# Altium PCB CM5IO_V2.PcbDoc (part 1 of 4)
Units mm, origin at the board's own origin, x right, y up, seen from the top; angles counter-clockwise.
Board outline 160 x 90 mm, 4 copper layers (F.Cu, In1.Cu, In2.Cu, B.Cu); 77 components, 161 nets, 674 pads, 703 vias.
Unrouted connection lines stored in the file: 47.
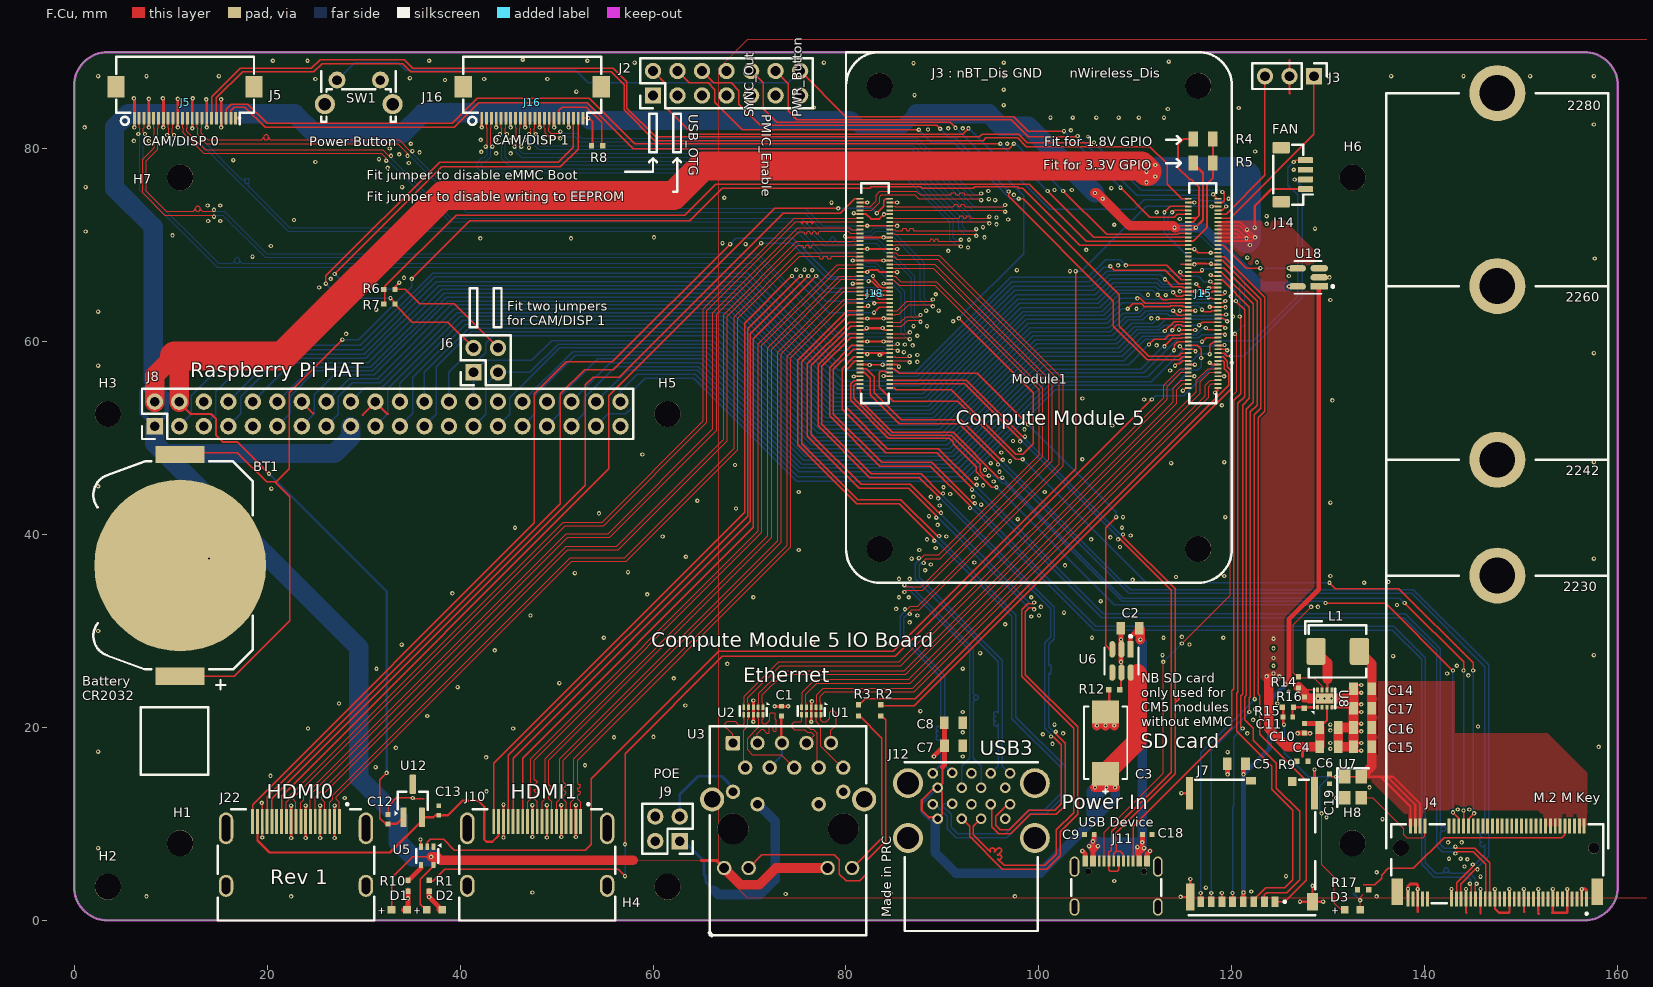
[diagram p0: F.Cu view]
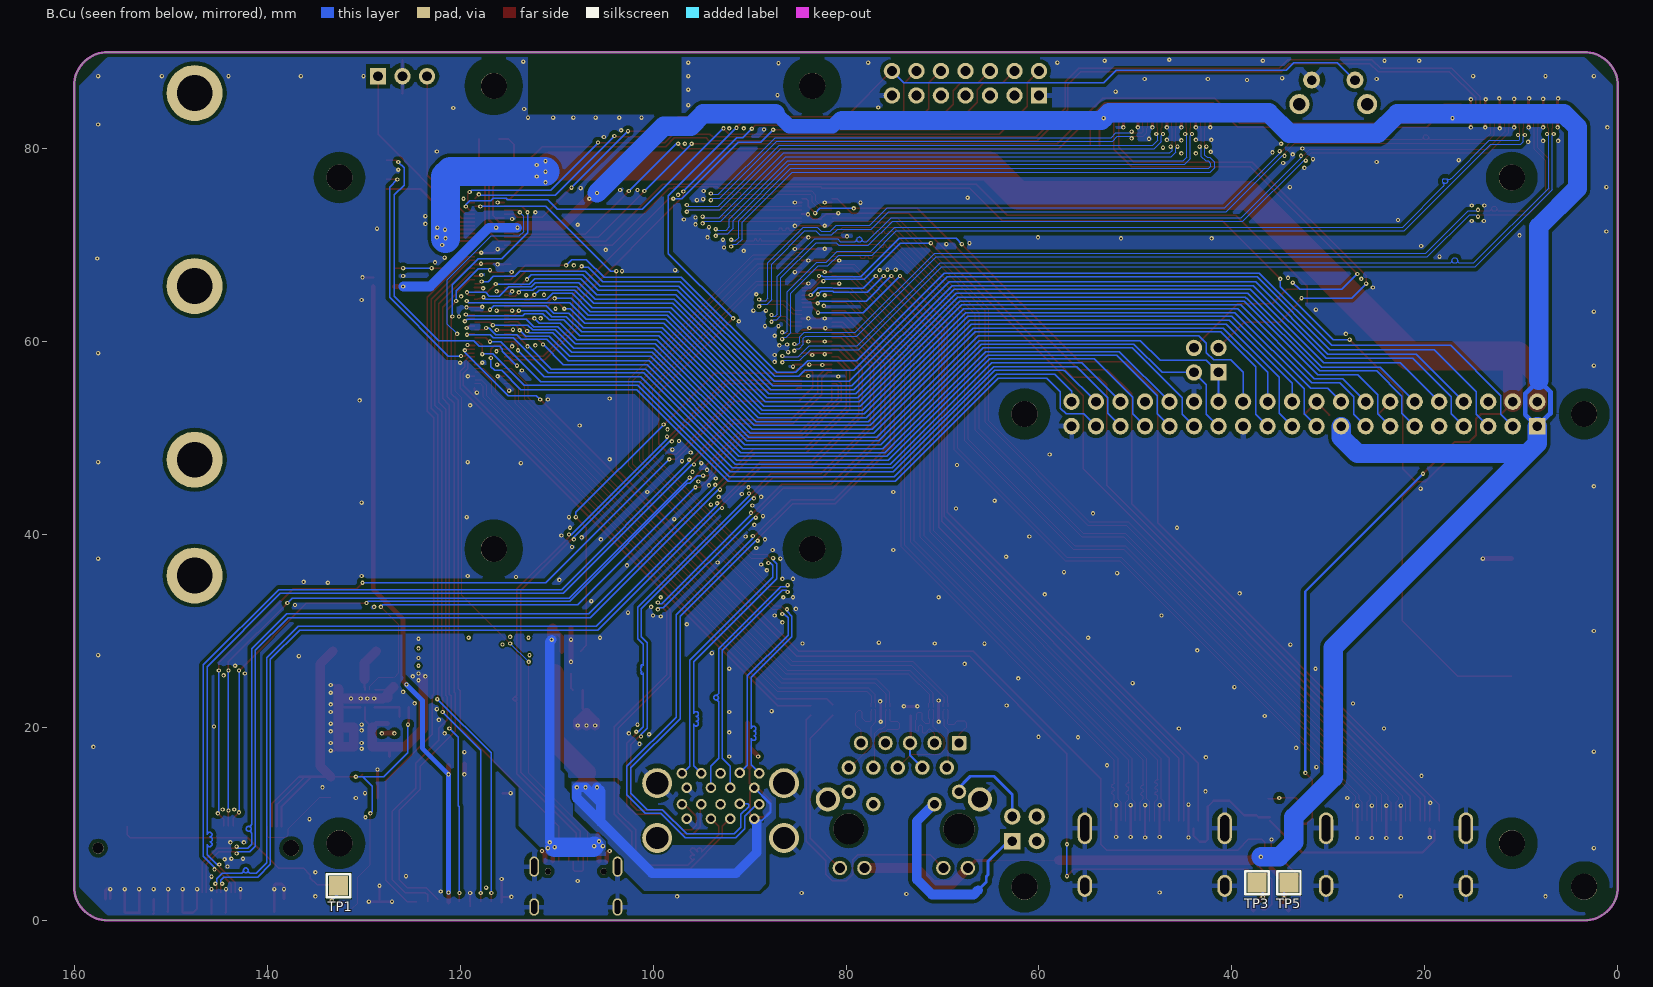
[diagram p1: B.Cu view, seen from below]
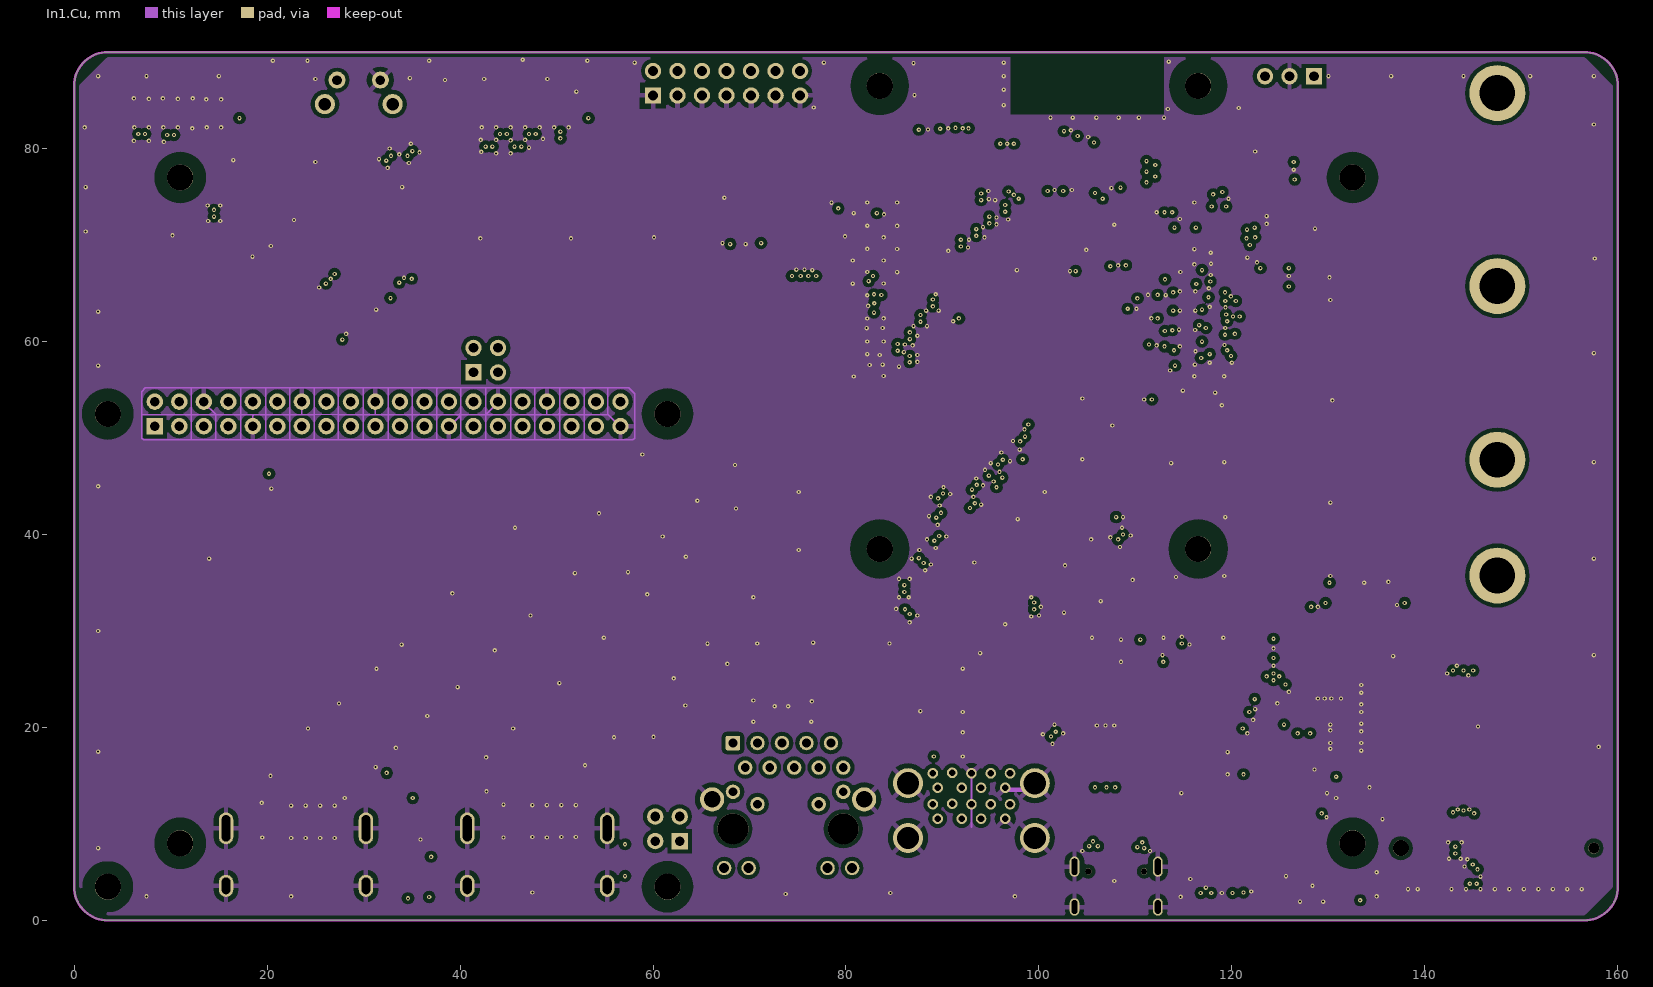
[diagram p2: In1.Cu]
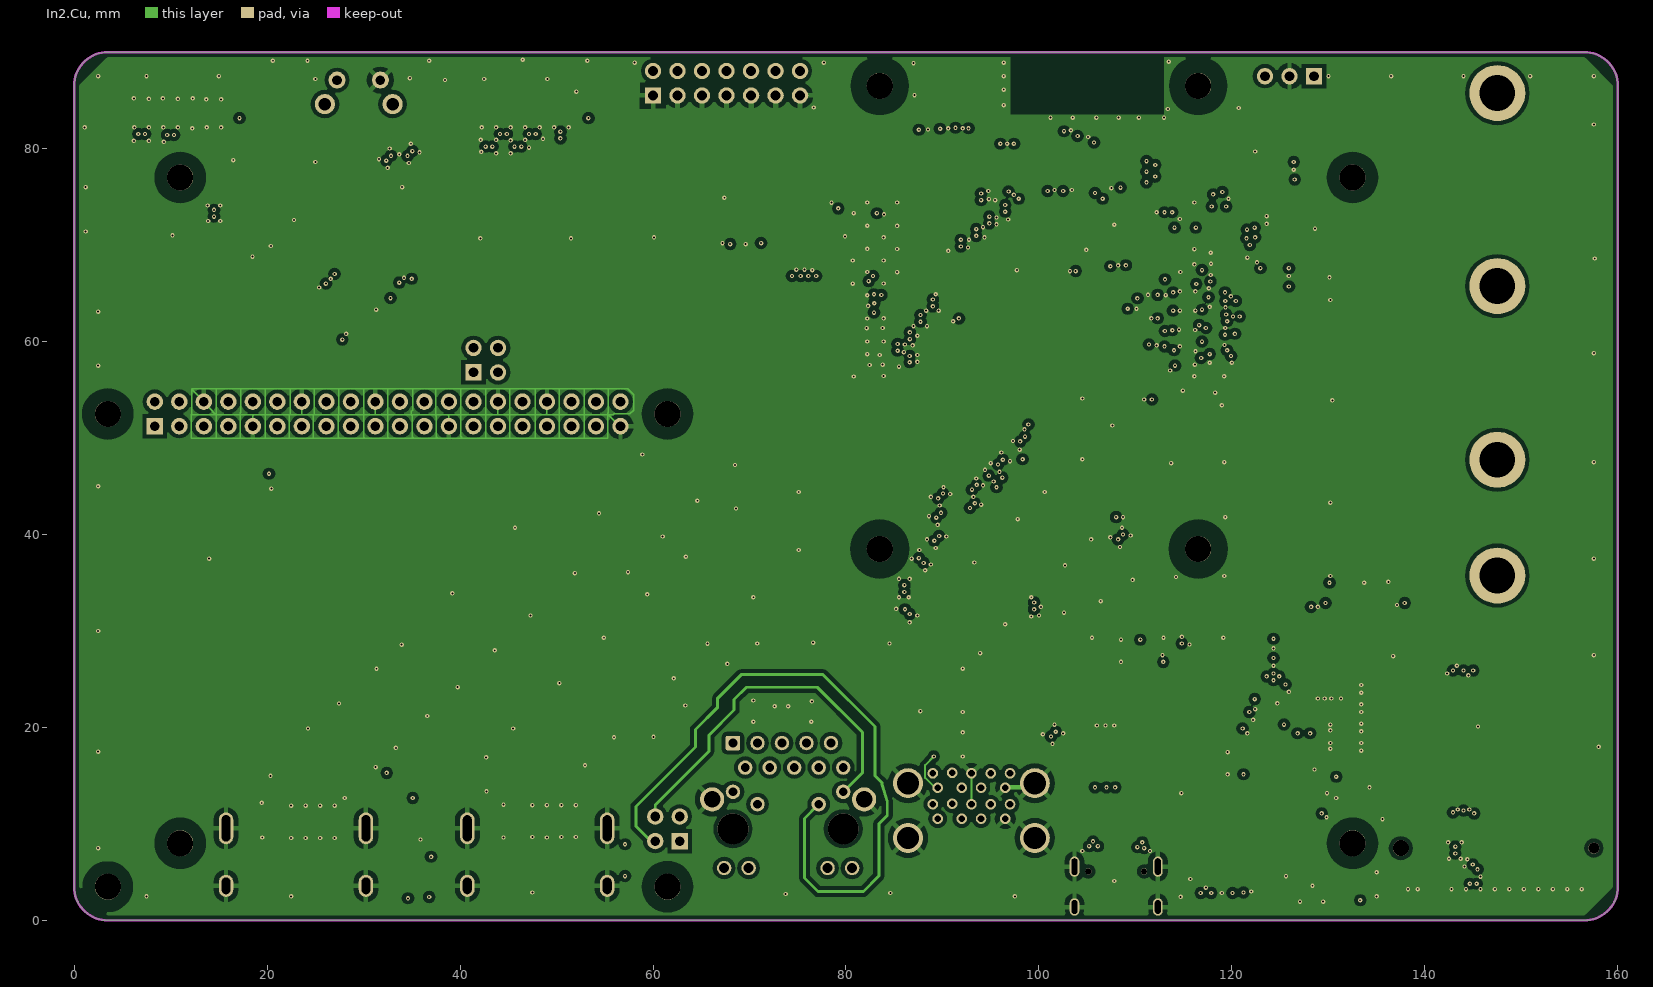
[diagram p3: In2.Cu]

## Layer stack, top to bottom
F.Mask: solder mask 0.0102, Solder Resist, Dk 3.5
F.Cu: signal copper 0.0356
Dielectric 1: dielectric 0.32, FR-4, Dk 4.8
In1.Cu: signal copper 0.0356
Dielectric2: dielectric 0.32, FR-4, Dk 4.8
In2.Cu: signal copper 0.0356
Dielectric3: dielectric 0.32, FR-4, Dk 4.8
B.Cu: signal copper 0.0356
B.Mask: solder mask 0.0102, Solder Resist, Dk 3.5

## Board outline
156.5,0 ccw(c156.5,3.5) 160,3.5 160,86.5 ccw(c156.5,86.5) 156.5,90 3.5,90 ccw(c3.5,86.5) 0,86.5 0,3.5 ccw(c3.5,3.5) 3.5,0 156.5,0

## Design rules (kind name [scope] priority, off if disabled: settings)
Clearance "Clearence 1.7_PadClass" [InPadClass('Pad Class Clearance 1.7')] p1: gap=1.7 ignorepadtopadclearanceinfootprint=FALSE
Clearance "Clearence 1.3_PadClass" [InPadClass('Pad Class Clearance 1.3')] p2: gap=1.3 ignorepadtopadclearanceinfootprint=FALSE
Clearance "Clearence 0.4_Polygon" [InNamedPolygon('In1.Cu-GND') OR InNamedPolygon('In2.Cu-GND')] p3: gap=0.4 ignorepadtopadclearanceinfootprint=FALSE
Clearance "Clearence 0.39_Polygon" [InNamedPolygon('F.Cu-GND') OR InNamedPolygon('B.Cu-GND')] p4: gap=0.39 ignorepadtopadclearanceinfootprint=FALSE
Clearance "Clearence 0.2_Polygon" [InNamedPolygon('F.Cu-/PCIe-M2/M2_3v3') OR InNamedPolygon('F.Cu-/+5v') OR InNamedPolygon('F.Cu-/PCIe-M2/M2_3v3-1') OR InNamedPolygon('B.Cu-/+5v') OR InNamedPolygon('B.Cu-/CM5_HighSpeed/VBUS')] p5: gap=0.2 ignorepadtopadclearanceinfootprint=FALSE
MinimumSolderMaskSliver [All] p1: minsoldermaskwidth=0
PolygonConnect Polygon_B.Cu-/CM5_HighSpeed/VBUS_ConnectDirect [IsNamedPolygon('B.Cu-/CM5_HighSpeed/VBUS') vs IsVia] p1: connectstyle=Direct reliefconductorwidth=0.254 reliefentries=4 polygonreliefangle="90 Angle" airgapwidth=0.254
PolygonConnect Polygon_B.Cu-/CM5_HighSpeed/VBUS_ConnectRelief45 [IsNamedPolygon('B.Cu-/CM5_HighSpeed/VBUS') vs (IsThruPin or IsSMTPin) and (PadShape_AllLayers = 'Round')] p2: connectstyle=Relief reliefconductorwidth=0.5 reliefentries=4 polygonreliefangle="45 Angle" airgapwidth=0.5
PolygonConnect Polygon_B.Cu-/CM5_HighSpeed/VBUS_ConnectRelief90 [IsNamedPolygon('B.Cu-/CM5_HighSpeed/VBUS') vs (IsThruPin or IsSMTPin) and (PadShape_AllLayers <> 'Round')] p3: connectstyle=Relief reliefconductorwidth=0.5 reliefentries=4 polygonreliefangle="90 Angle" airgapwidth=0.5
PolygonConnect Polygon_B.Cu-/+5v_ConnectDirect [IsNamedPolygon('B.Cu-/+5v') vs IsVia] p4: connectstyle=Direct reliefconductorwidth=0.254 reliefentries=4 polygonreliefangle="90 Angle" airgapwidth=0.254
PolygonConnect Polygon_B.Cu-/+5v_ConnectRelief45 [IsNamedPolygon('B.Cu-/+5v') vs (IsThruPin or IsSMTPin) and (PadShape_AllLayers = 'Round')] p5: connectstyle=Relief reliefconductorwidth=0.5 reliefentries=4 polygonreliefangle="45 Angle" airgapwidth=0.5
PolygonConnect Polygon_B.Cu-/+5v_ConnectRelief90 [IsNamedPolygon('B.Cu-/+5v') vs (IsThruPin or IsSMTPin) and (PadShape_AllLayers <> 'Round')] p6: connectstyle=Relief reliefconductorwidth=0.5 reliefentries=4 polygonreliefangle="90 Angle" airgapwidth=0.5
PolygonConnect Polygon_B.Cu-GND_ConnectDirect [IsNamedPolygon('B.Cu-GND') vs IsVia] p7: connectstyle=Direct reliefconductorwidth=0.254 reliefentries=4 polygonreliefangle="90 Angle" airgapwidth=0.254
PolygonConnect Polygon_B.Cu-GND_ConnectRelief45 [IsNamedPolygon('B.Cu-GND') vs (IsThruPin or IsSMTPin) and (PadShape_AllLayers = 'Round')] p8: connectstyle=Relief reliefconductorwidth=0.508 reliefentries=4 polygonreliefangle="45 Angle" airgapwidth=0.508
PolygonConnect Polygon_B.Cu-GND_ConnectRelief90 [IsNamedPolygon('B.Cu-GND') vs (IsThruPin or IsSMTPin) and (PadShape_AllLayers <> 'Round')] p9: connectstyle=Relief reliefconductorwidth=0.508 reliefentries=4 polygonreliefangle="90 Angle" airgapwidth=0.508
PolygonConnect Polygon_In2.Cu-GND_ConnectDirect [IsNamedPolygon('In2.Cu-GND') vs IsVia] p10: connectstyle=Direct reliefconductorwidth=0.254 reliefentries=4 polygonreliefangle="90 Angle" airgapwidth=0.254
PolygonConnect Polygon_In2.Cu-GND_ConnectRelief45 [IsNamedPolygon('In2.Cu-GND') vs (IsThruPin or IsSMTPin) and (PadShape_AllLayers = 'Round')] p11: connectstyle=Relief reliefconductorwidth=0.508 reliefentries=4 polygonreliefangle="45 Angle" airgapwidth=0.508
PolygonConnect Polygon_In2.Cu-GND_ConnectRelief90 [IsNamedPolygon('In2.Cu-GND') vs (IsThruPin or IsSMTPin) and (PadShape_AllLayers <> 'Round')] p12: connectstyle=Relief reliefconductorwidth=0.508 reliefentries=4 polygonreliefangle="90 Angle" airgapwidth=0.508
PolygonConnect Polygon_In1.Cu-GND_ConnectDirect [IsNamedPolygon('In1.Cu-GND') vs IsVia] p13: connectstyle=Direct reliefconductorwidth=0.254 reliefentries=4 polygonreliefangle="90 Angle" airgapwidth=0.254
PolygonConnect Polygon_In1.Cu-GND_ConnectRelief45 [IsNamedPolygon('In1.Cu-GND') vs (IsThruPin or IsSMTPin) and (PadShape_AllLayers = 'Round')] p14: connectstyle=Relief reliefconductorwidth=0.508 reliefentries=4 polygonreliefangle="45 Angle" airgapwidth=0.508
PolygonConnect Polygon_In1.Cu-GND_ConnectRelief90 [IsNamedPolygon('In1.Cu-GND') vs (IsThruPin or IsSMTPin) and (PadShape_AllLayers <> 'Round')] p15: connectstyle=Relief reliefconductorwidth=0.508 reliefentries=4 polygonreliefangle="90 Angle" airgapwidth=0.508
PolygonConnect Polygon_F.Cu-GND_ConnectDirect [IsNamedPolygon('F.Cu-GND') vs IsVia] p16: connectstyle=Direct reliefconductorwidth=0.254 reliefentries=4 polygonreliefangle="90 Angle" airgapwidth=0.254
PolygonConnect Polygon_F.Cu-GND_ConnectRelief45 [IsNamedPolygon('F.Cu-GND') vs (IsThruPin or IsSMTPin) and (PadShape_AllLayers = 'Round')] p17: connectstyle=Relief reliefconductorwidth=0.508 reliefentries=4 polygonreliefangle="45 Angle" airgapwidth=0.508
PolygonConnect Polygon_F.Cu-GND_ConnectRelief90 [IsNamedPolygon('F.Cu-GND') vs (IsThruPin or IsSMTPin) and (PadShape_AllLayers <> 'Round')] p18: connectstyle=Relief reliefconductorwidth=0.508 reliefentries=4 polygonreliefangle="90 Angle" airgapwidth=0.508
PolygonConnect Polygon_F.Cu-/PCIe-M2/M2_3v3-1_ConnectDirect [IsNamedPolygon('F.Cu-/PCIe-M2/M2_3v3-1') vs IsVia] p19: connectstyle=Direct reliefconductorwidth=0.254 reliefentries=4 polygonreliefangle="90 Angle" airgapwidth=0.254
PolygonConnect Polygon_F.Cu-/PCIe-M2/M2_3v3-1_ConnectRelief45 [IsNamedPolygon('F.Cu-/PCIe-M2/M2_3v3-1') vs (IsThruPin or IsSMTPin) and (PadShape_AllLayers = 'Round')] p20: connectstyle=Relief reliefconductorwidth=0.5 reliefentries=4 polygonreliefangle="45 Angle" airgapwidth=0.5
PolygonConnect Polygon_F.Cu-/PCIe-M2/M2_3v3-1_ConnectRelief90 [IsNamedPolygon('F.Cu-/PCIe-M2/M2_3v3-1') vs (IsThruPin or IsSMTPin) and (PadShape_AllLayers <> 'Round')] p21: connectstyle=Relief reliefconductorwidth=0.5 reliefentries=4 polygonreliefangle="90 Angle" airgapwidth=0.5
PolygonConnect Polygon_F.Cu-/+5v_ConnectDirect [IsNamedPolygon('F.Cu-/+5v') vs IsVia] p22: connectstyle=Direct reliefconductorwidth=0.254 reliefentries=4 polygonreliefangle="90 Angle" airgapwidth=0.254
PolygonConnect Polygon_F.Cu-/+5v_ConnectRelief45 [IsNamedPolygon('F.Cu-/+5v') vs (IsThruPin or IsSMTPin) and (PadShape_AllLayers = 'Round')] p23: connectstyle=Relief reliefconductorwidth=0.5 reliefentries=4 polygonreliefangle="45 Angle" airgapwidth=0.5
PolygonConnect Polygon_F.Cu-/+5v_ConnectRelief90 [IsNamedPolygon('F.Cu-/+5v') vs (IsThruPin or IsSMTPin) and (PadShape_AllLayers <> 'Round')] p24: connectstyle=Relief reliefconductorwidth=0.5 reliefentries=4 polygonreliefangle="90 Angle" airgapwidth=0.5
PolygonConnect Polygon_F.Cu-/PCIe-M2/M2_3v3_ConnectDirect [IsNamedPolygon('F.Cu-/PCIe-M2/M2_3v3') vs IsVia] p25: connectstyle=Direct reliefconductorwidth=0.254 reliefentries=4 polygonreliefangle="90 Angle" airgapwidth=0.254
PolygonConnect Polygon_F.Cu-/PCIe-M2/M2_3v3_ConnectRelief45 [IsNamedPolygon('F.Cu-/PCIe-M2/M2_3v3') vs (IsThruPin or IsSMTPin) and (PadShape_AllLayers = 'Round')] p26: connectstyle=Relief reliefconductorwidth=0.5 reliefentries=4 polygonreliefangle="45 Angle" airgapwidth=0.5
PolygonConnect Polygon_F.Cu-/PCIe-M2/M2_3v3_ConnectRelief90 [IsNamedPolygon('F.Cu-/PCIe-M2/M2_3v3') vs (IsThruPin or IsSMTPin) and (PadShape_AllLayers <> 'Round')] p27: connectstyle=Relief reliefconductorwidth=0.5 reliefentries=4 polygonreliefangle="90 Angle" airgapwidth=0.5
RoutingVias [All] p1: holewidth=0.711 width=1.27 viastyle="Through Hole" minholewidth=0.711 minwidth=1.27 maxholewidth=0.711 maxwidth=1.27
SilkToSilkClearance [All] p1: silktosilkclearance=0
SilkToSolderMaskClearance [IsPad] p1: minsilkscreentomaskgap=0 clearancetoexposedcopper=TRUE
SolderMaskExpansion [All] p1: expansion=0.102 istentingtop=FALSE
SupplyNets "Schematic Supply Nets_7" [InNet('M2_3v3')] p1: voltage=0.000
SupplyNets "Schematic Supply Nets_6" [InNet('HDMI_5v')] p2: voltage=0.000
SupplyNets "Schematic Supply Nets_5" [InNet('VBUS')] p3: voltage=0.000
SupplyNets "Schematic Supply Nets_4" [InNet('SD_PWR')] p4: voltage=0.000
SupplyNets "Schematic Supply Nets_3" [InNet('+3.3v')] p5: voltage=0.000
SupplyNets "Schematic Supply Nets_2" [InNet('+1.8v')] p6: voltage=0.000
SupplyNets "Schematic Supply Nets_1" [InNet('+5v')] p7: voltage=0.000
SupplyNets "Schematic Supply Nets" [InNet('GND')] p8: voltage=0.000
Width [All] p1: maxlimit=10 minlimit=0.254 preferedwidth=0.254 minimp=50.000000 maximp=50.000000 favimp=50.000000
27 further rules are at their usual default settings.

## Classes and differential pairs
component class PCIe-M2: C4 C6 C10 C11 C14 C15 C16 C17 C19 D3 J4 L1 M1 M2 M3 M4 M5 R14 R15 R16 R17 TP1 U7 U8
component class CM5_HighSpeed: C2 C3 C7 C8 C9 C12 C13 C18 H1 H2 H3 H4 H5 H6 H7 H8 J5 J6 J10 J11 J12 J16 J18 J22 R6 R7 R8 R9 R12 U6 U12
component class CM5_GPIO: BT1 C1 C5 D1 D2 J2 J3 J7 J8 J9 J14 J15 Module1 R1 R2 R3 R4 R5 R10 SW1 TP3 TP5 U1 U2 U3 U5 U18
pad class "Pad Class Clearance 1.7": Module1-Un1 Module1-Un2 Module1-Un3 Module1-Un4
pad class "Pad Class Clearance 1.3": H1-Un1 H2-Un1 H3-Un1 H4-Un1 H5-Un1 H6-Un1 H7-Un1 H8-Un1

## Components (designator, comment, footprint, x,y, rotation, side; value= is the part's Value field where it differs from the comment)
BT1 "3034TR RPI" "3034TR RPI" 11,36.8 r270 top
C1 "100nF, 16V" WCAP-CSGP_0402_H=0.5mm 73.3,21.7 r270 top value=100nF
C2 "10uF, 16V" WCAP-CSGP_0805_H=1.25mm 109.438,30.3 r0 top value=10uF
C3 "EEF-CX0J101R" FP-CX-MFG 106.9,18.413 r270 top value=100uF
C4 "10uF, 16V" WCAP-CSGP_0805_H=1.25mm 130.05,20 r0 top value=10uF
C5 "10uF, 16V" WCAP-CSGP_0805_H=1.25mm 120.45,16.25 r0 top value=10uF
C6 "10uF, 16V" WCAP-CSGP_0805_H=1.25mm 130.05,18 r0 top value=10uF
C7 "10uF, 16V" WCAP-CSGP_0805_H=1.25mm 91.15,18.1 r0 top value=10uF
C8 "10uF, 16V" WCAP-CSGP_0805_H=1.25mm 91.138,20.5 r0 top value=10uF
C9 "100nF, 16V" WCAP-CSGP_0402_H=0.5mm 105.22,8.9 r0 top value=100nF
C10 "100nF, 16V" WCAP-CSGP_0402_H=0.5mm 127.5,19.915 r270 top value=100nF
C11 "4.7nF, 16V" WCAP-CSGP_0402_H=0.5mm 125.8,21.1 r0 top value=4.7nF
C12 "100nF, 16V" WCAP-CSGP_0402_H=0.5mm 32.55,10.5 r90 top value=100nF
C13 "100nF, 16V" WCAP-CSGP_0402_H=0.5mm 37.8,11.4 r90 top value=100nF
C14 "10uF, 16V" WCAP-CSGP_0805_H=1.25mm 133.55,24 r180 top value=10uF
C15 "10uF, 16V" WCAP-CSGP_0805_H=1.25mm 133.55,18 r180 top value=10uF
C16 "10uF, 16V" WCAP-CSGP_0805_H=1.25mm 133.55,20 r180 top value=10uF
C17 "10uF, 16V" WCAP-CSGP_0805_H=1.25mm 133.538,22 r180 top value=10uF
C18 "100nF, 16V" WCAP-CSGP_0402_H=0.5mm 111.22,8.9 r180 top value=100nF
C19 "100nF, 16V" WCAP-CSGP_0402_H=0.5mm 130.1,14.68 r270 top value=100nF
D1 "Red, 2V" WL-SMCW_0603_H=0.7mm_Red 33.7,1.1 r180 top
D2 "Green, 3.2V" WL-SMCW_0603_H=0.7mm_Green 37.35,1.1 r180 top
D3 "Green, 3.2V" WL-SMCW_0603_H=0.7mm_Green 132.5,1.1 r180 top
H1 "MountingHole CMIO" "MountingHole CMIO" 11,8 r0 top
H2 "MountingHole CMIO" "MountingHole CMIO" 3.5,3.5 r0 top
H3 "MountingHole CMIO" "MountingHole CMIO" 3.5,52.5 r0 top
H4 "MountingHole CMIO" "MountingHole CMIO" 61.5,3.5 r0 top
H5 "MountingHole CMIO" "MountingHole CMIO" 61.5,52.5 r0 top
H6 "MountingHole CMIO" "MountingHole CMIO" 132.5,77 r0 top
H7 "MountingHole CMIO" "MountingHole CMIO" 11,77 r0 top
H8 "MountingHole CMIO" "MountingHole CMIO" 132.5,8 r0 top
J2 "Conn 02x07 Odd Even" "Conn 02x07 Odd Even" 60,85.5 r90 top value=14
J3 "Conn 01x03" "Conn 01x03" 128.5,87.5 r270 top value=3
J4 "M.2 M Key connector RPI" "M.2 M Key connector RPI" 147.5,7.5 r180 top locked
J5 "FH12-22S-0.5SH(55)" FH12-22S-0.5SH(55) 11.5,85 r180 top
J6 "THD-02-R" THD-02-R 41.4,56.8 r90 top value=4
J7 "503398-1892 RPI" "503398-1892 RPI" 122.08,7.55 r180 top
J8 "THD-20-R" THD-20-R 8.37,51.23 r90 top value=40
J9 "THD-02-R" THD-02-R 62.77,8.23 r180 top value=4
J10 "690-019-298-412" 690-019-298-412 48,9.55 r0 top
J11 "USB4105-GF-A RPI" "USB4105-GF-A RPI" 108,2.475 r0 top locked
J12 "UBAF30-D2011-2" UBAF30-D2011-2 93,8.55 r0 top
J14 "JST_SHBM04B-SRSS-TB" JST_SHBM04B-SRSS-TB 126.3,77.3 r90 top
J15 "10164227-1001A1RLF" CM5-BergStak-10164227 117,65 r0 top
J16 "FH12-22S-0.5SH(55)" FH12-22S-0.5SH(55) 47.5,85 r180 top
J18 "10164227-1001A1RLF" CM5-BergStak-10164227 83,65 r0 top
J22 "690-019-298-412" 690-019-298-412 23,9.55 r0 top
L1 "SRP5030CC-2R2M" SRP5030CC-2R2M 130.95,27.9 r0 top
Module1 "ComputeModule5 CM5" ComputeModule5-CM5 116.5,86.5 r180 top locked
R1 "RES SMD 1K OHM 1% 1/10W 0402" SMD-0402-RES 36.8,3.6 r0 top value=1k
R2 "RES SMD 470 OHM 1% 1/10W 0402" SMD-0402-RES 83.6,21.785 r0 top value=470
R3 "RES SMD 470 OHM 1% 1/10W 0402" SMD-0402-RES 81.3,21.785 r0 top value=470
R4 "ERJ-6GEY0R00V" SMD-0805-RES 117,81 r90 top value=0.0
R5 "ERJ-6GEY0R00V" SMD-0805-RES 117,78.5 r90 top value=0.0
R6 "RES SMD 2.2K OHM 1% 1/10W 0402" SMD-0402-RES 32.685,65.4 r270 top value=2.2k
R7 "RES SMD 2.2K OHM 1% 1/10W 0402" SMD-0402-RES 32.685,63.9 r270 top value=2.2k
R8 "RES SMD 2.2K OHM 1% 1/10W 0402" SMD-0402-RES 54.215,80.3 r90 top value=2.2k
R9 "RES SMD 2.2K OHM 1% 1/10W 0402" SMD-0402-RES 127.3,16.5 r270 top value=2.2k
R10 "RES SMD 1K OHM 1% 1/10W 0402" SMD-0402-RES 34.6,3.6 r0 top value=1k
R12 "RES SMD 15K OHM 1% 1/10W 0402" SMD-0402-RES 107.8,23.9 r270 top value=15k
R14 "RES SMD 100K OHM 1% 1/10W 0402" SMD-0402-RES 126.9,24.685 r180 top value=100k
R15 "RES SMD 10K OHM 1% 1/10W 0402" SMD-0402-RES 125.8,22.1 r90 top value=10k
R16 "RES SMD 2.2K OHM 1% 1/10W 0402" SMD-0402-RES 127.5,22.585 r0 top value=2.2k
R17 "RES SMD 1K OHM 1% 1/10W 0402" SMD-0402-RES 133.6,3.2 r90 top value=1k
SW1 "PTS645VH58-2LFS" PTS645VH58-2LFS 27.25,87.1 r0 top
TP1 "TEST_POINT 1" "TEST_POINT 1" 132.6,3.6 r180 bottom
TP3 "TEST_POINT 1" "TEST_POINT 1" 37.412,3.9 r180 bottom
TP5 "TEST_POINT 1" "TEST_POINT 1" 34.1,3.9 r180 bottom
U1 "TPD4EUSB30" TPD4EUSB30 76.4,21.715 r270 top
U2 "TPD4EUSB30" TPD4EUSB30 70.4,21.715 r270 top
U3 "A70-112-331N126" A70-112-331N126 74,9.5 r0 top
U5 "74LVC1G07SE-7 RPI" "74LVC1G07SE-7 RPI" 36.6,6.7 r270 top
U6 "AP22653W6-7" FP-SOT26-IPC_A 108.55,26.899 r270 top
U7 "ASEK-32.768KHZ-L-R-T" ASEK-32.768KHZ-L-R-T 132.55,13.8 r270 top
U8 "AP3441SHE-7B" AP3441SHE-7B 129.6,23 r90 top
U12 "RT9742SNGV" RT9742SNGV 35.1,12.4 r90 top
U18 "RT9742GGJ5" FP-RT9742GGJ5-IPC_A 127.9,66.65 r180 top

## Footprints (in the part's own frame and the unit in brackets; to place one, negate y for a bottom-side part, rotate by r counter-clockwise, add the part's x,y. Pads: shape width x height; smd on the part's side, far side on the other; paste and mask are expansions set on the pad)
"74LVC1G07SE-7 RPI" [mm]
  rrect25% 0.65x0.4 smd mask+0: 1(-0.95,0.65) 2(-0.95,0) 3(-0.95,-0.65) 4(0.95,-0.65) 5(0.95,0.65)
  silkscreen extent -1.32,-1.16 0.7,1.44, body extent -2.16,-1.58 2.16,1.58, height 0.25
690-019-298-412 [mm]
  rect 0.3x2.6 smd mask+0: 1(4.5,0.73) 2(4,0.73) 3(3.5,0.73) 4(3,0.73) 5(2.5,0.73) 6(2,0.73) 7(1.5,0.73) 8(1,0.73) 9(0.5,0.73) 10(0,0.73) 11(-0.5,0.73) 12(-1,0.73) 13(-1.5,0.73) 14(-2,0.73) 15(-2.5,0.73) 16(-3,0.73) 17(-3.5,0.73) 18(-4,0.73) 19(-4.5,0.73)
  rrect100% 1.5x3.3 hole 2.7 slot 0.9 at 0 deg paste-2539.97 mask+0: SH1(7.25,0) SH2(-7.25,0)
  rrect100% 1.5x2.3 hole 1.7 slot 0.9 at 0 deg paste-2539.97 mask+0: SH3(-7.25,-5.96) SH4(7.25,-5.96)
  silkscreen extent -8.1,-9.55 8.1,2.6, body extent -7.5,-10.12 7.5,1.75, height 6.24
"3034TR RPI" [mm]
  rect 1.77x5.08 smd mask+0: 1(-11.485,0) 1(11.485,0)
  round 17.8 smd paste-17.8 mask+0: 2(0,0)
  silkscreen extent -10.78,-9 12.88,7.54, body extent -11.62,-8.73 11.62,7.74, height 4.32
"503398-1892 RPI" [mm]
  rect 0.7x1.1 smd mask+0: 1(-2.38,5.625) 2(-1.28,5.625) 3(-0.18,5.625) 4(0.92,5.625) 5(2.02,5.625) 6(3.12,5.625) 7(4.22,5.625) 8(5.32,5.625)
  rect 0.9x0.93 smd mask+0: 9(-4.17,-6.84)
  rect 1.05x0.78 smd mask+0: 10(0.095,-6.915)
  rect 0.7x3.33 smd mask+0: 11(-6.48,-5.64) 11(6.48,-5.64)
  rect 1.14x1.83 smd mask+0: 11(-6.26,5.61)
  rect 0.86x2.8 smd mask+0: 11(6.4,5.125)
  silkscreen extent -6.55,-7.02 6.55,7.02, body extent -6.5,-7.1 6.6,6.95, height 1.28
A70-112-331N126 [mm]
  rrect17% 1.5x1.5 hole 0.9 paste-2539.97 mask+0: 1(-5.715,8.89)
  round 1.5 hole 0.9 paste-2539.97 mask+0: 2(-4.445,6.35) 3(-3.175,8.89) 4(-1.905,6.35) 5(-0.635,8.89) 6(0.635,6.35) 7(1.905,8.89) 8(3.175,6.35) 9(4.445,8.89) 10(5.715,6.35) 11(-5.715,3.83) 12(-3.175,2.56) 13(3.175,2.56) 14(5.715,3.83)
  round 1.5 hole 1.02 paste-2539.97 mask+0: 15(-6.63,-4.06) 16(-4.09,-4.06) 17(4.09,-4.06) 18(6.63,-4.06)
  round 2.5 hole 1.7 paste-2539.97 mask+0: 19(-7.875,3.05) 20(7.875,3.05)
  round 3.2 hole 3.2 paste-2539.97 mask+0: Un1(-5.715,0) Un2(5.715,0)
  silkscreen extent -8.25,-11.15 8.12,10.62, body extent -8.12,-10.85 8.12,10.4, height 13.65
AP3441SHE-7B [mm]
  rect 0.5x0.3 smd mask+0: 1(-0.9,0.75) 2(-0.9,0.25) 3(-0.9,-0.25) 4(-0.9,-0.75) 5(0.9,-0.75) 6(0.9,-0.25) 7(0.9,0.25) 8(0.9,0.75)
  rect 1.05x1.75 smd paste-1.75 mask+0: 9(0,0)
  rect 0.85x0.65 on Top Paste mask-0.85: Un1(0,0.437) Un2(0,-0.437)
  silkscreen extent -1.62,-1.1 1,1.37, body extent -1.04,-1.04 1.04,1.04, height 0.61
ASEK-32.768KHZ-L-R-T [mm]
  rect 1.4x1.2 smd mask+0: 1(-1.1,-0.85) 2(1.1,-0.85) 3(1.1,0.85) 4(-1.1,0.85)
  silkscreen extent -2,-1.65 2,1.65, body extent -1.9,-1.4 1.9,1.4, height 0.25
CM5-BergStak-10164227 [mm]
  round 0.5 on Top Overlay mask+0: NF(0,0)
ComputeModule5-CM5 [mm]
  rect 0.7x0.2 smd mask+0: 1(-2.04,31.3) 2(1.04,31.3) 3(-2.04,30.9) 4(1.04,30.9) 5(-2.04,30.5) 6(1.04,30.5) 7(-2.04,30.1) 8(1.04,30.1) 9(-2.04,29.7) 10(1.04,29.7) 11(-2.04,29.3) 12(1.04,29.3) 13(-2.04,28.9) 14(1.04,28.9) 15(-2.04,28.5) 16(1.04,28.5) 17(-2.04,28.1) 18(1.04,28.1) 19(-2.04,27.7) 20(1.04,27.7) 21(-2.04,27.3) 22(1.04,27.3) 23(-2.04,26.9) 24(1.04,26.9) 25(-2.04,26.5) 26(1.04,26.5) 27(-2.04,26.1) 28(1.04,26.1) 29(-2.04,25.7) 30(1.04,25.7) 31(-2.04,25.3) 32(1.04,25.3) 33(-2.04,24.9) 34(1.04,24.9) 35(-2.04,24.5) 36(1.04,24.5) 37(-2.04,24.1) 38(1.04,24.1) 39(-2.04,23.7) 40(1.04,23.7) 41(-2.04,23.3) 42(1.04,23.3) 43(-2.04,22.9) 44(1.04,22.9) 45(-2.04,22.5) 46(1.04,22.5) 47(-2.04,22.1) 48(1.04,22.1) 49(-2.04,21.7) 50(1.04,21.7) 51(-2.04,21.3) 52(1.04,21.3) 53(-2.04,20.9) 54(1.04,20.9) 55(-2.04,20.5) 56(1.04,20.5) 57(-2.04,20.1) 58(1.04,20.1) 59(-2.04,19.7) 60(1.04,19.7) 61(-2.04,19.3) 62(1.04,19.3) 63(-2.04,18.9) 64(1.04,18.9) 65(-2.04,18.5) 66(1.04,18.5) 67(-2.04,18.1) 68(1.04,18.1) 69(-2.04,17.7) 70(1.04,17.7) 71(-2.04,17.3) 72(1.04,17.3) 73(-2.04,16.9) 74(1.04,16.9) 75(-2.04,16.5) 76(1.04,16.5) 77(-2.04,16.1) 78(1.04,16.1) 79(-2.04,15.7) 80(1.04,15.7) 81(-2.04,15.3) 82(1.04,15.3) 83(-2.04,14.9) 84(1.04,14.9) 85(-2.04,14.5) 86(1.04,14.5) 87(-2.04,14.1) 88(1.04,14.1) 89(-2.04,13.7) 90(1.04,13.7) 91(-2.04,13.3) 92(1.04,13.3) 93(-2.04,12.9) 94(1.04,12.9) 95(-2.04,12.5) 96(1.04,12.5) 97(-2.04,12.1) 98(1.04,12.1) 99(-2.04,11.7) 100(1.04,11.7) 101(31.96,31.3) 102(35.04,31.3) 103(31.96,30.9) 104(35.04,30.9) 105(31.96,30.5) 106(35.04,30.5) 107(31.96,30.1) 108(35.04,30.1) 109(31.96,29.7) 110(35.04,29.7) 111(31.96,29.3) 112(35.04,29.3) 113(31.96,28.9) 114(35.04,28.9) 115(31.96,28.5) 116(35.04,28.5) 117(31.96,28.1) 118(35.04,28.1) 119(31.96,27.7) 120(35.04,27.7) 121(31.96,27.3) 122(35.04,27.3) 123(31.96,26.9) 124(35.04,26.9) 125(31.96,26.5) 126(35.04,26.5) 127(31.96,26.1) 128(35.04,26.1) 129(31.96,25.7) 130(35.04,25.7) 131(31.96,25.3) 132(35.04,25.3) 133(31.96,24.9) 134(35.04,24.9) 135(31.96,24.5) 136(35.04,24.5) 137(31.96,24.1) 138(35.04,24.1) 139(31.96,23.7) 140(35.04,23.7) 141(31.96,23.3) 142(35.04,23.3) 143(31.96,22.9) 144(35.04,22.9) 145(31.96,22.5) 146(35.04,22.5) 147(31.96,22.1) 148(35.04,22.1) 149(31.96,21.7) 150(35.04,21.7) 151(31.96,21.3) 152(35.04,21.3) 153(31.96,20.9) 154(35.04,20.9) 155(31.96,20.5) 156(35.04,20.5) 157(31.96,20.1) 158(35.04,20.1) 159(31.96,19.7) 160(35.04,19.7) 161(31.96,19.3) 162(35.04,19.3) 163(31.96,18.9) 164(35.04,18.9) 165(31.96,18.5) 166(35.04,18.5) 167(31.96,18.1) 168(35.04,18.1) 169(31.96,17.7) 170(35.04,17.7) 171(31.96,17.3) 172(35.04,17.3) 173(31.96,16.9) 174(35.04,16.9) 175(31.96,16.5) 176(35.04,16.5) 177(31.96,16.1) 178(35.04,16.1) 179(31.96,15.7) 180(35.04,15.7) 181(31.96,15.3) 182(35.04,15.3) 183(31.96,14.9) 184(35.04,14.9) 185(31.96,14.5) 186(35.04,14.5) 187(31.96,14.1) 188(35.04,14.1) 189(31.96,13.7) 190(35.04,13.7) 191(31.96,13.3) 192(35.04,13.3) 193(31.96,12.9) 194(35.04,12.9) 195(31.96,12.5) 196(35.04,12.5) 197(31.96,12.1) 198(35.04,12.1) 199(31.96,11.7) 200(35.04,11.7)
  round 2.7 hole 2.7 paste-2539.97 mask+1.7: Un1(0,48) Un2(0,0) Un3(33,48) Un4(33,0)
  silkscreen extent -3.5,-3.5 36.5,51.5, body extent -2.18,10.21 35.2,32.81, height 1.41
"Conn 01x03" [mm]
  rect 1.7x1.7 hole 1 paste-2539.97 mask+0: 1(0,0)
  rrect100% 1.7x1.7 hole 1 paste-2539.97 mask+0: 2(0,-2.54) 3(0,-5.08)
  silkscreen extent -1.33,-6.41 1.33,1.33, body extent -1.27,-6.35 1.27,1.27, height 8.57
"Conn 02x07 Odd Even" [mm]
  rect 1.7x1.7 hole 1 paste-2539.97 mask+0: 1(0,0)
  rrect100% 1.7x1.7 hole 1 paste-2539.97 mask+0: 2(2.54,0) 3(0,-2.54) 4(2.54,-2.54) 5(0,-5.08) 6(2.54,-5.08) 7(0,-7.62) 8(2.54,-7.62) 9(0,-10.16) 10(2.54,-10.16) 11(0,-12.7) 12(2.54,-12.7) 13(0,-15.24) 14(2.54,-15.24)
  silkscreen extent -1.33,-16.57 3.87,1.33, body extent -1.27,-16.51 3.81,1.27, height 8.59
FH12-22S-0.5SH(55) [mm]
  rect 0.3x1.3 smd: 1(5.25,1.85) 2(4.75,1.85) 3(4.25,1.85) 4(3.75,1.85) 5(3.25,1.85) 6(2.75,1.85) 7(2.25,1.85) 8(1.75,1.85) 9(1.25,1.85) 10(0.75,1.85) 11(0.25,1.85) 12(-0.25,1.85) 13(-0.75,1.85) 14(-1.25,1.85) 15(-1.75,1.85) 16(-2.25,1.85) 17(-2.75,1.85) 18(-3.25,1.85) 19(-3.75,1.85) 20(-4.25,1.85) 21(-4.75,1.85) 22(-5.25,1.85)
  rect 1.8x2.2 smd: MP(-7.15,-1.4) MP(7.15,-1.4)
  silkscreen extent -7.15,-4.5 7.15,2.54, body extent -7.55,-4.49 7.55,1.91, height 2.06
FP-CX-MFG [mm]
  rect 2.4x2.8 smd paste+0 mask+0: 1(-3.2,0) 2(3.2,0)
  silkscreen extent -3.75,-2.25 5.28,2.25, body extent -4.5,-2.35 4.5,2.35, height 0.25
FP-RT9742GGJ5-IPC_A [mm]
  rect 1.82x0.668 smd paste+0 mask+0: 1(-1.143,0.94)
  rrect100% 1.82x0.668 smd paste+0 mask+0: 2(-1.143,0) 3(-1.143,-0.94) 4(1.143,-0.94) 5(1.143,0.94)
  silkscreen extent -2.68,-1.7 1.4,1.7, body extent -2.55,-1.95 2.55,1.95, height 0.25
FP-SOT26-IPC_A [mm]
  rect 1.707x0.616 smd paste+0 mask+0: 1(-1.201,0.95)
  rrect100% 1.707x0.616 smd paste+0 mask+0: 2(-1.201,0) 3(-1.201,-0.95) 4(1.201,-0.95) 5(1.201,0) 6(1.201,0.95)
  silkscreen extent -2.68,-1.75 1.4,1.75, body extent -2.55,-2 2.55,2, height 0.25
JST_SHBM04B-SRSS-TB [mm]
  rrect25% 0.6x1.55 smd mask+0: 1(-1.5,-1.325) 2(-0.5,-1.325) 3(0.5,-1.325) 4(1.5,-1.325)
  rrect21% 1.2x1.8 smd mask+0: MP(-2.8,1.2) MP(2.8,1.2)
  silkscreen extent -3.11,-2.1 3.11,2.01, body extent -3.5,-2.4 3.5,2, height 0.25
"M.2 M Key connector RPI" [mm]
  rect 0.3x1.55 smd mask+0.102: 1(-9.25,5.275) 2(-9,-2.275) 3(-8.75,5.275) 4(-8.5,-2.275) 5(-8.25,5.275) 6(-8,-2.275) 7(-7.75,5.275) 8(-7.5,-2.275) 9(-7.25,5.275) 10(-7,-2.275) 11(-6.75,5.275) 12(-6.5,-2.275) 13(-6.25,5.275) 14(-6,-2.275) 15(-5.75,5.275) 16(-5.5,-2.275) 17(-5.25,5.275) 18(-5,-2.275) 19(-4.75,5.275) 20(-4.5,-2.275) 21(-4.25,5.275) 22(-4,-2.275) 23(-3.75,5.275) 24(-3.5,-2.275) 25(-3.25,5.275) 26(-3,-2.275) 27(-2.75,5.275) 28(-2.5,-2.275) 29(-2.25,5.275) 30(-2,-2.275) 31(-1.75,5.275) 32(-1.5,-2.275) 33(-1.25,5.275) 34(-1,-2.275) 35(-0.75,5.275) 36(-0.5,-2.275) 37(-0.25,5.275) 38(0,-2.275) 39(0.25,5.275) 40(0.5,-2.275) 41(0.75,5.275) 42(1,-2.275) 43(1.25,5.275) 44(1.5,-2.275) 45(1.75,5.275) 46(2,-2.275) 47(2.25,5.275) 48(2.5,-2.275) 49(2.75,5.275) 50(3,-2.275) 51(3.25,5.275) 52(3.5,-2.275) 53(3.75,5.275) 54(4,-2.275) 55(4.25,5.275) 56(4.5,-2.275) 57(4.75,5.275) 58(5,-2.275) 67(7.25,5.275) 68(7.5,-2.275) 69(7.75,5.275) 70(8,-2.275) 71(8.25,5.275) 72(8.5,-2.275) 73(8.75,5.275) 74(9,-2.275) 75(9.25,5.275)
  round 5.8 hole 3.7 paste-2539.97 mask+0.2: M1(0,-28.25) M2(0,-40.25) M3(0,-58.25) M4(0,-78.25)
  rect 1.2x2.75 smd mask+0.102: S1(-10.35,4.5) S2(10.35,4.5)
  round 1.15 hole 1.15 paste-2539.97 mask+0: Un1(-10,0)
  round 1.65 hole 1.65 paste-2539.97 mask+0: Un2(10,0)
  silkscreen extent -11.5,-78.25 11.5,6.9, body extent -11.1,-3.15 11.1,6.15, height 0.25
"MountingHole CMIO" [mm]
  round 2.7 hole 2.7 paste-2539.97 mask+1.3: Un1(0,0)
PTS645VH58-2LFS [mm]
  round 1.75 hole 0.99 paste-2539.97 mask+0: 1(0,0) 2(4.5,0)
  round 2.1 hole 1.3 paste-2539.97 mask+0: Un1(-1.25,-2.49) Un2(5.76,-2.49)
  silkscreen extent -1.61,-4.31 6.11,0.9, body extent -1.95,-4.2 6.55,5.8, height 6.42
RT9742SNGV [mm]
  rrect25% 2x0.65 smd mask+0: 1(-1.71,0.95) 2(-1.71,-0.95) 3(1.71,0)
  silkscreen extent -1.52,-1.56 0.96,1.88, body extent -1.4,-1.5 1.4,1.5, height 1.15
SMD-0402-RES [mm]
  rect 0.55x0.55 smd: 1(0,0.584) 2(0,-0.584)
  body extent -0.28,-0.57 0.27,0.58, height 0.41
SMD-0805-RES [mil]
  rect 60x40 smd: 1(0,40) 2(0,-40)
  body extent -24,-39 26,39, height 31
SRP5030CC-2R2M [mm]
  rrect25% 2x2.8 smd mask+0: 1(-2.25,0) 2(2.25,0)
  silkscreen extent -3.35,-2.72 2.97,3.1, body extent -2.85,-2.6 2.85,2.6, height 3
"TEST_POINT 1" [mm]
  rect 2x2 smd paste-2 mask+0: 1(0,0)
  silkscreen extent -1.2,-1.2 1.2,1.2
THD-02-R [mm]
  rect 1.7x1.7 hole 1 paste-2539.97 mask+0: 1(0,0)
  rrect100% 1.7x1.7 hole 1 paste-2539.97 mask+0: 2(2.54,0) 3(0,-2.54) 4(2.54,-2.54)
  silkscreen extent -1.33,-3.87 3.87,1.33, body extent -1.27,-3.81 3.81,1.27, height 8.59
THD-20-R [mm]
  rect 1.7x1.7 hole 1 paste-2539.97 mask+0: 1(0,0)
  rrect100% 1.7x1.7 hole 1 paste-2539.97 mask+0: 2(2.54,0) 3(0,-2.54) 4(2.54,-2.54) 5(0,-5.08) 6(2.54,-5.08) 7(0,-7.62) 8(2.54,-7.62) 9(0,-10.16) 10(2.54,-10.16) 11(0,-12.7) 12(2.54,-12.7) 13(0,-15.24) 14(2.54,-15.24) 15(0,-17.78) 16(2.54,-17.78) 17(0,-20.32) 18(2.54,-20.32) 19(0,-22.86) 20(2.54,-22.86) 21(0,-25.4) 22(2.54,-25.4) 23(0,-27.94) 24(2.54,-27.94) 25(0,-30.48) 26(2.54,-30.48) 27(0,-33.02) 28(2.54,-33.02) 29(0,-35.56) 30(2.54,-35.56) 31(0,-38.1) 32(2.54,-38.1) 33(0,-40.64) 34(2.54,-40.64) 35(0,-43.18) 36(2.54,-43.18) 37(0,-45.72) 38(2.54,-45.72) 39(0,-48.26) 40(2.54,-48.26)
  silkscreen extent -1.33,-49.59 3.87,1.33, body extent -1.27,-49.53 3.81,1.27, height 8.59
TPD4EUSB30 [mm]
  rrect25% 0.55x0.3 smd mask+0: 1(-0.385,1) 2(-0.385,0.5) 3(-0.385,0) 4(-0.385,-0.5) 5(-0.385,-1) 6(0.385,-1) 7(0.385,-0.5) 8(0.385,0) 9(0.385,0.5) 10(0.385,1)
  silkscreen extent -0.9,-1.41 0.5,1.69, body extent -0.55,-1.3 0.55,1.3, height 0.55
UBAF30-D2011-2 [mm]
  round 3.1 hole 2.3 paste-2539.97 mask+0: 10(-6.57,0) 10(-6.57,5.68) 10(6.57,0) 10(6.57,5.68)
  round 1.1 hole 0.7 paste-2539.97 mask+0: A1(-3.5,2) A2(-1,2) A3(1,2) A4(3.5,2) A5(4,3.5) A6(2,3.5) A7(0,3.5) A8(-2,3.55) A9(-4,3.5) B1(-3.5,5.2) B2(-1,5.2) B3(1,5.2) B4(3.5,5.2) B5(4,6.7) B6(2,6.7) B7(0,6.7) B8(-2,6.75) B9(-4,6.7)
  silkscreen extent -6.89,-9.64 6.89,7.86, body extent -7.79,-11.78 7.79,7.92, height 16.16
"USB4105-GF-A RPI" [mm]
  rrect25% 0.6x1.15 smd mask+0: A1(-3.2,3.68) A4(-2.4,3.68) A9(2.4,3.68) A12(3.2,3.68) B1(3.2,3.68) B4(2.4,3.68) B9(-2.4,3.68) B12(-3.2,3.68)
  rrect25% 0.3x1.15 smd mask+0: A5(-1.25,3.68) A6(-0.25,3.68) A7(0.25,3.68) A8(1.25,3.68) B5(1.75,3.68) B6(0.75,3.68) B7(-0.75,3.68) B8(-1.75,3.68)
  rrect100% 1x1.8 hole 1.4 slot 0.6 at 0 deg mask+0: S1(-4.32,-1.075) S1(4.32,-1.075)
  rrect100% 1x2.1 hole 1.7 slot 0.6 at 0 deg mask+0: S1(-4.32,3.105) S1(4.32,3.105)
  round 0.65 hole 0.65 paste-2539.97 mask+0: Un1(-2.89,2.605) Un2(2.89,2.605)
  silkscreen extent -4.67,0.1 4.67,1.8, body extent -4.96,-3.94 4.96,4.27, height 0.25
WCAP-CSGP_0402_H=0.5mm [mm] "Ceramic Capacitors, body 1x0.5mm"
  rect 0.5x0.5 smd: 1(-0.5,0) 2(0.5,0)
  body extent -0.5,-0.25 0.5,0.25, height 0.25
WCAP-CSGP_0805_H=1.25mm [mm] "Ceramic Capacitors, body 2x1.25mm"
  rect 0.9x1.3 smd: 1(-0.95,0) 2(0.95,0)
  body extent -1,-0.6 1,0.6, height 0.95
WL-SMCW_0603_H=0.7mm_Green [mm] "SMD Mono-color Chip LED, body 1.6x0.8mm"
  rect 0.8x0.8 smd: 1(-0.8,0) 2(0.8,0)
  body extent -0.81,-0.4 0.81,0.4, height 0.6
WL-SMCW_0603_H=0.7mm_Red [mm] "SMD Mono-color Chip LED, body 1.6x0.8mm"
  rect 0.8x0.8 smd: 1(-0.8,0) 2(0.8,0)
  body extent -0.81,-0.4 0.81,0.4, height 0.6

## Part data
BT1: library part CMP-00029-00004-2, "Coin Cell Battery Holders COIN CELL RETAINER T APE/REEL 500PC", Case/Package=SMD/SMT, Package Quantity=500, Contact Material=Nickel, Contact Plating=Tin, Height=4.31mm, Lead Free="Lead Free", Material=Bronze, Mounting Technology="Surface Mount,PCB", Number of Batteries=1, Number of Cells=1, Number of Contacts=2, Packaging="Tape and Reel", Series=-, Termination=SMD/SMT
C1 C9 C10 C12 C13 C18 C19: library part CMP-01409-2, "WCAP-CSGP Multilayer Ceramic Chip Capacitor, General Purpose, size 0402, X5R, 100nF, 16V", Capacitance=100nF, Capacitance Tolerance=+/-20%, Isolation Resistance  min.=5GOhm, Manufacturer="Wurth Elektronik", Manufacturer Part Number=885012105016, Operating Temperature="-55 to +85degC", Rated Voltage=16VDC, Ceramic Type=X5R, Component Type=Standard, ComponentLink1Description=Manufacturer, ComponentLink1URL=http://www.we-online.de, ComponentLink2Description=Datasheet, ComponentLink2URL=https://www.we-online.com/catalog/datasheet/885012105016.pdf, Design Item ID=885012105016, Dissipation Factor max.=5%, Height=0.5mm, Mounting Technology=SMT, Packaging="Tape and Reel", Pin Count=2, Published Date="April 2021", Q-Factor min.=-, Size=0402, Source=WCAP-CSGP_0402.SchLib, Technical Reference=X5R0402104M016DFCT10000
C2 C4 C5 C6 C7 C8 C14 C15 C16 C17: library part CMP-01449-2, "WCAP-CSGP Multilayer Ceramic Chip Capacitor, General Purpose, size 0805, X5R, 10uF, 16V", Capacitance=10uF, Capacitance Tolerance=+/-20%, Isolation Resistance  min.=0.01GOhm, Manufacturer="Wurth Elektronik", Manufacturer Part Number=885012107014, Operating Temperature="-55 to +85degC", Rated Voltage=16VDC, Ceramic Type=X5R, Component Type=Standard, ComponentLink1Description=Manufacturer, ComponentLink1URL=http://www.we-online.de, ComponentLink2Description=Datasheet, ComponentLink2URL=https://www.we-online.com/catalog/datasheet/885012107014.pdf, Design Item ID=885012107014, Dissipation Factor max.=10%, Height=1.25mm, Mounting Technology=SMT, Packaging="Tape and Reel", Pin Count=2, Published Date="April 2021", Q-Factor min.=-, Size=0805, Source=WCAP-CSGP_0805.SchLib, Technical Reference=X5R0805106M016DFCT10000
C3: library part CMP-000464-1, "Cap Aluminum 100uF 6.3V 20% (7.3 X 4.3 X 1.9mm) SMD 0.015 Ohm 2700mA 1000h 105C Embossed T/R", Case Code (Imperial)=2917, Case Code (Metric)=7343, ESR (Equivalent Series Resistance)=15mR, Leakage Current=63uA, Max Operating Temperature=105°C, Min Operating Temperature=-40°C, Package Quantity=3500, Ripple Current=2.7A, Tolerance=20%, Voltage=6.3V, Case/Package=2917, Construction=Flat, Depth=4.3mm, Dissipation Factor=0.06%, Height=1.9mm, Lead Diameter=2.4mm, Lead Free="Lead Free", Lead Pitch=1.3mm, Length=7.3mm, Life (Hours)=1000Hour, Mounting Technology="Surface Mount,PCB", Packaging="Tape and Reel", Pins=2, Radiation Hardening=No, Reach SVHC Compliant=No, Ripple Current (AC)=2.7A, RoHS Compliant=Yes, Series="SP-Cap CX", Termination=SMD/SMT, Voltage Rating=6.3V, Voltage Rating (DC)=6.3V, Weight=0.004586oz, Width=4.3mm
C11: library part CMP-01518-2, "WCAP-CSGP Multilayer Ceramic Chip Capacitor, General Purpose, size 0402, X7R, 4.7nF, 16V", Capacitance=4.7nF, Capacitance Tolerance=+/-10%, Isolation Resistance  min.=10GOhm, Manufacturer="Wurth Elektronik", Manufacturer Part Number=885012205029, Operating Temperature="-55 to +125degC", Rated Voltage=16VDC, Ceramic Type=X7R, Component Type=Standard, ComponentLink1Description=Manufacturer, ComponentLink1URL=http://www.we-online.de, ComponentLink2Description=Datasheet, ComponentLink2URL=https://www.we-online.com/catalog/datasheet/885012205029.pdf, Design Item ID=885012205029, Dissipation Factor max.=3.5%, Height=0.5mm, Mounting Technology=SMT, Packaging="Tape and Reel", Pin Count=2, Published Date="April 2021", Q-Factor min.=-, Size=0402, Source=WCAP-CSGP_0402.SchLib, Technical Reference=X7R0402472K016DFCT10000
D1: library part CMP-00986-4, "WL-SMCW SMT Mono-color Chip LED Waterclear, size 0603, Red, 2V, 140deg", Emitting Color=Red, Forward Voltage typ.=2V, Operating Temperature="-40 to +85degC", Part Number=150060RS75000, Chip Technology=AlInGaP, Component Type=Standard, ComponentLink1Description=Manufacturer, ComponentLink1URL=http://www.we-online.de, ComponentLink2Description=Datasheet, ComponentLink2URL=https://www.we-online.com/catalog/datasheet/150060RS75000.pdf, Design Item ID=150060RS75000, Dominant Wavelength typ.=625nm, ES P/N=0176-0439-6, Luminous Intensity typ.=250mcd, Mounting Technology=SMT, Packaging="Tape and Reel", Peak Wavelength typ.=630nm, Pin Count=2, Published Date="December 2019", Publisher="Wurth Elektronik", Size=0603, SM P/N=6949-59100742, Source=WL-SMCW_0603.SchLib, Viewing Angle=140deg
D2 D3: library part CMP-00983-5, "WL-SMCW SMT Mono-color Chip LED Waterclear, size 0603, Green, 3.2V, 140deg", Emitting Color=Green, Forward Voltage typ.=3.2V, Operating Temperature="-40 to +85degC", Part Number=150060GS75000, Chip Technology=InGaN, Component Type=Standard, ComponentLink1Description=Manufacturer, ComponentLink1URL=http://www.we-online.de, ComponentLink2Description=Datasheet, ComponentLink2URL=https://www.we-online.com/catalog/datasheet/150060GS75000.pdf, Design Item ID=150060GS75000, Dominant Wavelength typ.=525nm, ES P/N=0176-1070-9, Luminous Intensity typ.=430mcd, Mounting Technology=SMT, Packaging="Tape and Reel", Peak Wavelength typ.=515nm, Pin Count=2, Published Date="December 2019", Publisher="Wurth Elektronik", Size=0603, SM P/N=59100121, Source=WL-SMCW_0603.SchLib, Viewing Angle=140deg
H1 H2 H3 H4 H5 H6 H7 H8: library part CMP-00028-00023-1
J2: library part CMP-002-00171-1, "PinHeader 2x07 P2.54mm Vertical", Contact Resistance=20mOhm, Manufacturer="Wurth Elektronik", Manufacturer Part Number=61301421121, Operating Temperature="-40 to +105degC", Rated Current=3A, Withstanding Voltage=500VAC, Working Voltage=250VAC, Component Type=Standard, ComponentLink1Description=Manufacturer, ComponentLink1URL=http://www.we-online.de, ComponentLink2Description=Datasheet, ComponentLink2URL=https://www.we-online.com/catalog/datasheet/61301421121.pdf, Design Item ID=61301421121, Gender="Pin Header", Mounting Technology=THT, Orientation=Vertical, Packaging=Bag, Pin Count=14, Pin Number=14, Pitch=2.54mm, Published Date="May 2020", Row Number=Dual, Source="WR-PHD_Pin Header_2.54mm.SchLib"
J3: library part CMP-002-00173-1, "PinHeader_1x03_P2.54mm_Vertical", Contact Resistance=20mOhm, Manufacturer="Wurth Elektronik", Manufacturer Part Number=61300311121, Operating Temperature="-40 to +105degC", Rated Current=3A, Withstanding Voltage=500VAC, Working Voltage=250VAC, Component Type=Standard, ComponentLink1Description=Manufacturer, ComponentLink1URL=http://www.we-online.de, ComponentLink2Description=Datasheet, ComponentLink2URL=https://www.we-online.com/catalog/datasheet/61300311121.pdf, Design Item ID=61300311121, Gender="Pin Header", Mounting Technology=THT, Orientation=Vertical, Packaging=Bag, Pin Count=3, Pin Number=3, Pitch=2.54mm, Published Date="May 2020", Row Number=Single, Source="WR-PHD_Pin Header_2.54mm.SchLib"
J4: library part CMP-633-000140-1, "M.2 NGFF M-KEY H4.2mm Conn Card Edge SKT 67 POS 0.5mm Solder RA SMD T/R", Color=Black, Contact Current Rating=500mA, Max Operating Temperature=80°C, Min Operating Temperature=-40°C, Contact Material="Copper Alloy", Contact Plating=Gold,Matte, ELV=Compliant, Gender=Female, Height=0.165inch, Housing Color=Black, Housing Material=Thermoplastic, Insulation Material=Thermoplastic, Length=0.862inch, Mount="Surface Mount", Number of Positions=67, Number of Rows=2, Orientation="Right Angle", Packaging="Tape and Reel", PCB Mounting Orientation="Right Angle", Pitch=0.5mm, RoHS Compliant=Yes, SM P/N=13806721, Termination=Solder, Width=8.7mm
J5 J16: library part CMP-002-00175-3, "Connectors for Connecting - 0.5/1-mm Pitch FPC/FFC - FH12 Series (HIROSE ELECTRIC)", Color=Beige,Brown, Contact Resistance=50mR, Current Rating=500mA, Flammability Rating="UL94 V-0", Housing Color=Beige, Insulation Resistance=500MR, Max Current Rating=400mA, Max Operating Temperature=85°C, Max Voltage Rating (AC)=50V, Min Operating Temperature=-40°C, Package Quantity=2000, Actuator Material=Polyphenylene, Contact Location=Bottom, Contact Material=Bronze, Contact Plating=Gold, Depth=5.6mm, Gender=Female, Housing Material=Polyamide, Lead Free="Lead Free", Lead Pitch=0.5mm, Length=15.1mm, Material=Polyamide, Mating Cycles=20, Mounting Technology="Surface Mount,Horizontal", Number of Contacts=22, Number of Positions=22, Number of Rows=1, Orientation="Right Angle", Packaging="Tape and Reel", Pitch=0.5mm, Radiation Hardening=No, Reach SVHC Compliant=No, RoHS Compliant=Yes, Series=FH12, Termination=Solder, Voltage Rating=50V, Voltage Rating (AC)=50V, Width=15.1mm, Wire/Cable Type=Straight
J6 J9: library part CMP-002-00174-1, "PinHeader 2x02 P2.54mm Vertical", Contact Resistance=20mOhm, Manufacturer="Wurth Elektronik", Manufacturer Part Number=61300421121, Operating Temperature="-40 to +105degC", Rated Current=3A, Withstanding Voltage=500VAC, Working Voltage=250VAC, Component Type=Standard, ComponentLink1Description=Manufacturer, ComponentLink1URL=http://www.we-online.de, ComponentLink2Description=Datasheet, ComponentLink2URL=https://www.we-online.com/catalog/datasheet/61300421121.pdf, Design Item ID=61300421121, Gender="Pin Header", Mounting Technology=THT, Orientation=Vertical, Packaging=Bag, Pin Count=4, Pin Number=4, Pitch=2.54mm, Published Date="May 2020", Row Number=Dual, Source="WR-PHD_Pin Header_2.54mm.SchLib"
J7: library part CMP-002-00170-1, "1.10mm Pitch microSD Memory Card Connector, Normal Mount Surface Mount, Push-Push Type, 1.28mm Height", Current Rating=500mA, Max Operating Temperature=85°C, Min Operating Temperature=-25°C, Package Quantity=2400, Voltage Rating (AC)=10V, Contact Material="Bronze,Stainless Steel", Contact Plating=Gold, Depth=14.05mm, Gender=Male, Halogen Free="Low Halogen", Housing Material=Thermoplastic, Length=13.6mm, Mounting Technology="Surface Mount", Number Of Circuits=8, Number of Contacts=8, Number of Rows=1, Orientation="Right Angle", Packaging="Tape and Reel", Pitch=1.1mm, Reach SVHC Compliant=Unknown, RoHS Compliant=Yes, Series=503398, Termination=Solder, Width=14.05mm
J8: library part CMP-002-00167-3, "Through hole straight pin header, 2x20, 2.54mm pitch, double rows", Contact Resistance=20mOhm, Manufacturer="Wurth Elektronik", Manufacturer Part Number=61304021121, Operating Temperature="-40 to +105degC", Rated Current=3A, Withstanding Voltage=500VAC, Working Voltage=250VAC, Component Type=Standard, ComponentLink1Description=Manufacturer, ComponentLink1URL=http://www.we-online.de, ComponentLink2Description=Datasheet, ComponentLink2URL=https://www.we-online.com/catalog/datasheet/61304021121.pdf, Design Item ID=61304021121, Gender="Pin Header", Mounting Technology=THT, Orientation=Vertical, Packaging=Bag, Pin Count=40, Pin Number=40, Pitch=2.54mm, Published Date="May 2020", Row Number=Dual, Source="WR-PHD_Pin Header_2.54mm.SchLib"
J10 J22: library part CMP-135-000008-2, "Connector: HDMI; socket; PIN: 19; gold-plated; Body coating: tinned", EDAC ALT P/N=694D119-664-011, EDAC Link=https://edac.net/series/694d
J11: library part CMP-002-00177-3, "Conn USB 2.0 Type C RCP 24 POS 0.3mm/0.5mm Solder RA SMD 24 Terminal 1 Port T/R", Flammability Rating="UL94 V-0", Insulation Color=Black, Max Operating Temperature=85°C, Min Operating Temperature=-40°C, Voltage Rating=20V, Connector Type=USB, Contact Material=Nickel,Gold, Contact Plating=Gold, Gender=Receptacle, Height=3.46mm, Mating Cycles=10000, Mounting Technology="Surface Mount,Through Hole,Horizontal", Number of Contacts=16, Number of Ports=1, Series=USB4105, Shielding=Shielded, Termination=Solder, USB Standard="USB 2.0"
J12: library part CMP-002-00176-3, "Conn USB 3.0 Type A RCP 18 POS 2mm/2mm Solder RA Thru-Hole 18 Terminal 2 Port T/R", Flammability Rating="UL94 V-0", Insulation Color=Blue, Max Operating Temperature=85°C, Min Operating Temperature=-55°C, Connector Type=USB, Contact Material="Copper Alloy,Copper", Contact Plating=Gold, Gender=Receptacle, Lead Free="Lead Free", Mating Cycles=5000, Mounting Technology="Through Hole,Horizontal", MT Link=https://www.mtconntech.com/double-deck-usb-af-3-0-type-90-degree-dip-type-connector-product/, Number of Contacts=18, Number of Ports=2, Orientation="Right Angle", Reach SVHC Compliant=No, RoHS Compliant=Yes, Series=USB1100, Shielding=Shielded, Termination=Solder, USB Standard="USB 3.0"
J14: library part CMP-002-00172-1, "Board Connector, 4 Contact(s), 1 Row(s), Male, Straight, Surface Mount Terminal", Color=Natural, Package Quantity=1500, Contact Material="Copper Alloy", Contact Plating=Tin,Lead, Contact Type="Male Pin", Housing Color=Natural, Housing Material=Nylon, Lead Free="Contains Lead", Mounting Technology="Surface Mount", Number of Contacts=4, Number of Positions=4, Number of Rows=1, Orientation=Vertical, Packaging="Cut Tape", Pitch=0.039inch, Series=SR, Termination=Solder
J15 J18: library part CMP-634-000024-1, "CM5 1.5mm Height 0.4MM Btb, 100P, Receptacle, 1.5MM Stack Height"
L1: library part CMP-006-00047-1, "Inductor Power Shielded Wirewound 2.2uH 20% 100KHz 15Q-FactorCarbonyl Powder 7A 0.032Ohm DCR 2220 T/R"
Module1: library part CMP-633-000139-6, "Raspberry Pi Compute Module 5"
R1 R10 R17: library part CMP-236-000247-2, Digi-Key Part Number=P1.00KLCT-ND, Manufacturer="Panasonic Electronic Components", Operating Temperature="-55°C ~ 155°C", Package / Case="0402 (1005 Metric)", Part Number=ERJ-2RKF1001X, Power (Watts)="0.1W, 1/10W", Supplier Device Package=0402, Temperature Coefficient=±100ppm/°C, Tolerance=±1%, @ qty=1500, Composition="Thick Film", Datasheets=http://industrial.panasonic.com/www-cgi/jvcr13pz.cgi?E+PZ+3+AOA0002+ERJ2RKF1001X+7+WW, Factory Stock=0, Failure Rate=-, Features="Automotive AEC-Q200", Height - Seated (Max)="0.016\" (0.40mm)", Image=//media.digikey.com/Photos/Panasonic%20Photos/ERJ-PA2-Series.jpg, Minimum Quantity=1, Number of Terminations=2, Packaging="Cut Tape (CT)", Part Status=Active, Quantity Available=1787831, Series=ERJ, Size / Dimension="0.039\" L x 0.020\" W (1.00mm x 0.50mm)", Unit Price (USD)=0.00496
R2 R3: library part CMP-236-000627-2, Digi-Key Part Number=P470LCT-ND, Manufacturer="Panasonic Electronic Components", Operating Temperature="-55°C ~ 155°C", Package / Case="0402 (1005 Metric)", Part Number=ERJ-2RKF4700X, Power (Watts)="0.1W, 1/10W", Supplier Device Package=0402, Temperature Coefficient=±100ppm/°C, Tolerance=±1%, @ qty=1500, Composition="Thick Film", Datasheets=http://industrial.panasonic.com/www-cgi/jvcr13pz.cgi?E+PZ+3+AOA0002+ERJ2RKF4700X+7+WW, Factory Stock=0, Failure Rate=-, Features="Automotive AEC-Q200", Height - Seated (Max)="0.016\" (0.40mm)", Image=//media.digikey.com/Photos/Panasonic%20Photos/ERJ-PA2-Series.jpg, Minimum Quantity=1, Number of Terminations=2, Packaging="Cut Tape (CT)", Part Status=Active, Quantity Available=52644, Series=ERJ, Size / Dimension="0.039\" L x 0.020\" W (1.00mm x 0.50mm)", Unit Price (USD)=0.00496
R4 R5: library part CMP-775-000874-3, "RES SMD 0.0 OHM JUMPER 1/8W 0805", Digi-Key Part Number=P0.0ACT-ND, Manufacturer="Panasonic Electronic Components", Operating Temperature="-55?C ~ 155?C", Package / Case="0805 (2012 Metric)", Power (Watts)="0.125W, 1/8W", Supplier Device Package=0805, Temperature Coefficient=-, Tolerance=Jumper, @ qty=1500, Component Type=Standard, Composition="Thick Film", Datasheets=http://industrial.panasonic.com/www-cgi/jvcr13pz.cgi?E+PZ+3+AOA0001+ERJ6GEY0R00V+7+WW, Design Item ID=ERJ-6GEY0R00V, ES P/N=0150-1835-2, Factory Stock=0, Failure Rate=-, Features="Automotive AEC-Q200", Height - Seated (Max)="0.028\" (0.70mm)", Image=//media.digikey.com/Renders/Panasonic%20Renders/ERJ-0805%20Pkg.jpg, Minimum Quantity=1, Number of Terminations=2, Packaging="Cut Tape (CT)", Part Number=ERJ-6GEY0R00V, Part Status=Active, Pin Count=2, Quantity Available=1597627, Series=ERJ, Size / Dimension="0.079\" L x 0.049\" W (2.00mm x 1.25mm)", Source=Panasonic_ERJ_0805.SchLib, Unit Price (USD)=0.00544
R6 R7 R8 R9 R16: library part CMP-236-000428-2, Digi-Key Part Number=P2.20KLCT-ND, Manufacturer="Panasonic Electronic Components", Operating Temperature="-55°C ~ 155°C", Package / Case="0402 (1005 Metric)", Part Number=ERJ-2RKF2201X, Power (Watts)="0.1W, 1/10W", Supplier Device Package=0402, Temperature Coefficient=±100ppm/°C, Tolerance=±1%, @ qty=1500, Composition="Thick Film", Datasheets=http://industrial.panasonic.com/www-cgi/jvcr13pz.cgi?E+PZ+3+AOA0002+ERJ2RKF2201X+7+WW, Factory Stock=0, Failure Rate=-, Features="Automotive AEC-Q200", Height - Seated (Max)="0.016\" (0.40mm)", Image=//media.digikey.com/Photos/Panasonic%20Photos/ERJ-PA2-Series.jpg, Minimum Quantity=1, Number of Terminations=2, Packaging="Cut Tape (CT)", Part Status=Active, Quantity Available=301785, Series=ERJ, Size / Dimension="0.039\" L x 0.020\" W (1.00mm x 0.50mm)", Unit Price (USD)=0.00496
R12: library part CMP-236-000339-2, Digi-Key Part Number=P15.0KLCT-ND, Manufacturer="Panasonic Electronic Components", Operating Temperature="-55°C ~ 155°C", Package / Case="0402 (1005 Metric)", Part Number=ERJ-2RKF1502X, Power (Watts)="0.1W, 1/10W", Supplier Device Package=0402, Temperature Coefficient=±100ppm/°C, Tolerance=±1%, @ qty=1500, Composition="Thick Film", Datasheets=http://industrial.panasonic.com/www-cgi/jvcr13pz.cgi?E+PZ+3+AOA0002+ERJ2RKF1502X+7+WW, Factory Stock=0, Failure Rate=-, Features="Automotive AEC-Q200", Height - Seated (Max)="0.016\" (0.40mm)", Image=//media.digikey.com/Photos/Panasonic%20Photos/ERJ-PA2-Series.jpg, Minimum Quantity=1, Number of Terminations=2, Packaging="Cut Tape (CT)", Part Status=Active, Quantity Available=1023884, Series=ERJ, Size / Dimension="0.039\" L x 0.020\" W (1.00mm x 0.50mm)", Unit Price (USD)=0.00496
R14: library part CMP-236-000249-2, Digi-Key Part Number=P100KLCT-ND, Manufacturer="Panasonic Electronic Components", Operating Temperature="-55°C ~ 155°C", Package / Case="0402 (1005 Metric)", Part Number=ERJ-2RKF1003X, Power (Watts)="0.1W, 1/10W", Supplier Device Package=0402, Temperature Coefficient=±100ppm/°C, Tolerance=±1%, @ qty=1500, Composition="Thick Film", Datasheets=http://industrial.panasonic.com/www-cgi/jvcr13pz.cgi?E+PZ+3+AOA0002+ERJ2RKF1003X+7+WW, Factory Stock=0, Failure Rate=-, Features="Automotive AEC-Q200", Height - Seated (Max)="0.016\" (0.40mm)", Image=//media.digikey.com/Photos/Panasonic%20Photos/ERJ-PA2-Series.jpg, Minimum Quantity=1, Number of Terminations=2, Packaging="Cut Tape (CT)", Part Status=Active, Quantity Available=2645965, Series=ERJ, Size / Dimension="0.039\" L x 0.020\" W (1.00mm x 0.50mm)", Unit Price (USD)=0.00496
R15: library part CMP-236-000248-2, Digi-Key Part Number=P10.0KLCT-ND, Manufacturer="Panasonic Electronic Components", Operating Temperature="-55°C ~ 155°C", Package / Case="0402 (1005 Metric)", Part Number=ERJ-2RKF1002X, Power (Watts)="0.1W, 1/10W", Supplier Device Package=0402, Temperature Coefficient=±100ppm/°C, Tolerance=±1%, @ qty=1500, Composition="Thick Film", Datasheets=http://industrial.panasonic.com/www-cgi/jvcr13pz.cgi?E+PZ+3+AOA0002+ERJ2RKF1002X+7+WW, Factory Stock=0, Failure Rate=-, Features="Automotive AEC-Q200", Height - Seated (Max)="0.016\" (0.40mm)", Image=//media.digikey.com/Photos/Panasonic%20Photos/ERJ-PA2-Series.jpg, Minimum Quantity=1, Number of Terminations=2, Packaging="Cut Tape (CT)", Part Status=Active, Quantity Available=9922786, Series=ERJ, Size / Dimension="0.039\" L x 0.020\" W (1.00mm x 0.50mm)", Unit Price (USD)=0.00496
SW1: library part CMP-643-000011-1, "PTS645 Series Compact 6 x 6 mm SPST 2 N Through Hole Tactile Switch", Color=Black, Current Rating=50mA, Max Operating Temperature=60°C, Min Operating Temperature=-20°C, Operating Force=200gf, Package Quantity=1000, Voltage Rating (DC)=12V, Actuator Material=Nylon,Polyamide,PA66, Actuator Type=Standard, Contact Material=Brass,Silver, Contact Plating=Silver, Depth=9.8mm, Illumination Type=Non-Illuminated,Illuminated, Lead Free="Lead Free", Length=7.5mm, Max Current Rating=50mA, Mechanical Life=100000Cycles, Mounting Technology="Through Hole", Orientation="Right Angle", Packaging=Bulk, Reach SVHC Compliant=No, RoHS Compliant=Yes, Series=PTS645, Size=2.5mm, Switch Function=Off-Mom, Termination="PC Pin", Throw Configuration=SPST
TP1 TP3 TP5: library part CMP-633-000141-1, "Test Point SMT PAD", Component Type="Standard (No BOM)", Design Item ID=TEST_POINT, Pin Count=1